# Altium PCB Control.PcbDoc (part 2 of 2)
Units mm, origin at the board's own origin, x right, y up, seen from the top; angles counter-clockwise.
Board outline 30.5 x 82 mm, 2 copper layers (Top Layer, Bottom Layer), stack 1.071 mm thick; 79 components, 65 nets, 365 pads, 467 vias.
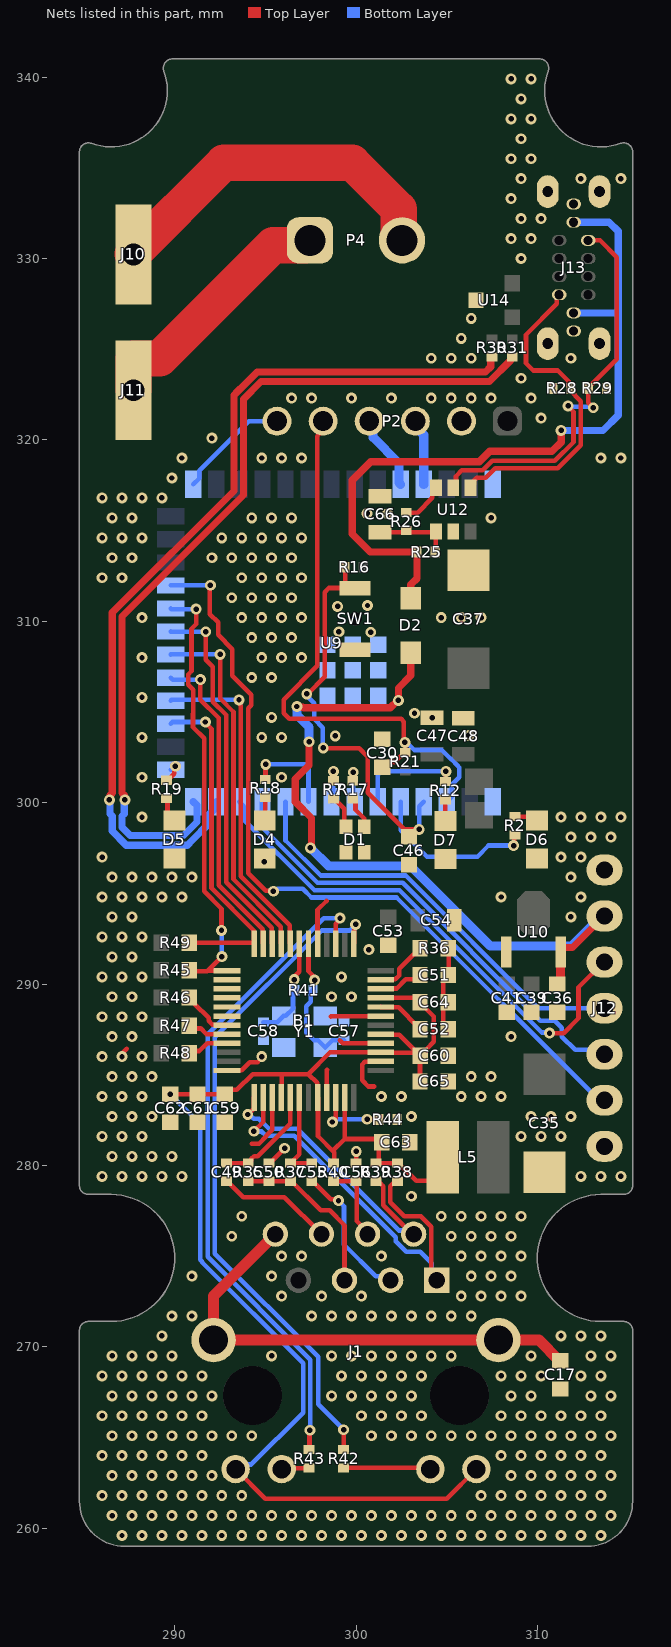
[diagram p2: the nets of this part, all layers, seen from the top]

## Via types
v1: diameter 0.6, hole 0.3, Top Layer to Bottom Layer, tented both sides, 467 vias

## Nets (pads, with @x,y where several pads share a name; then routed paths per layer and width w, separated by ;. In a path a pad name is that pad's centre, name@x,y a point inside that pad or via, vN(x,y) a via of type N, cw(c..) or ccw(c..) an arc to the next point about the centre after c; other vN are vias at no path point) (continued)
G: B1.3 B1.9 B1.14 B1.16 B1.19 B1.29 B1.38 B1.39 B1.40 B1.41 B1.42 B1.48 C17.1 C30.1 C35.2 C36.1 C37.2 C39.1 C41.1 C46.1 C47.1 C48.1 C50.1 C51.2 C52.2 C53.1 C54.1 C56.1 C57.1 C58.1 C59.1 C60.1 C61.1 C62.1 C63.1 C64.1 C65.1 C66.1 D1.3 D1.4 D4.2 D5.2 D6.2 D7.2 J12.1 J12.7 J13.A1/B12 J13.A12/B1 J13.MNT1 J13.MNT2 J13.MNT3 J13.MNT4 P2.2 R28.2 R29.2 R36.2 R44.1 SW1.2 U9.1 U9.40 U9.41 U9.42 U9.43 U9.44 U9.45 U9.46 U9.47 U9.48 U9.49 U10.1 U12.2 U14.3 Y1.2 Y1.4 | length 24.6
  Top Layer w0.254: v1@287.02,286.106 287.35,286.436 ; B1.48@292.738,285.235 292.761,285.258 293.693,285.258 294.134,285.699 294.589,285.699 ; 294.257,281.204 294.649,281.204 295.048,281.603 295.048,281.637 295.377,281.965 B1.3@295.377,283.745 ; C50.1@295.199,280.129 295.249,280.129 296.062,280.942 v1(296.062,280.949) ; B1.29@297.879,292.223 297.879,294.086 298.374,294.581 ; B1.9@298.379,283.747 298.379,285.247 298.399,285.267 ; 298.602,288.214 298.624,288.235 B1.19@301.367,288.235 ; 299.11,286.893 299.268,286.735 B1.16@301.367,286.735 ; C56.1@299.999,280.129 300.006,280.135 300.006,280.77 v1(300.012,280.776) ; 300.99,284.353 300.685,284.353 300.34,284.698 300.34,285.563 300.489,285.712 301.344,285.712 B1.14@301.367,285.735 ; C52.2@304.838,287.452 304.991,287.604 304.82,287.775 304.82,288.729 305.092,289.001 304.82,289.274 304.82,290.227 305.118,290.525 305.118,291.65 305.074,291.694 305.067,291.694 305.067,291.948 R36.2@305.092,291.973
  other v1: 287.1,259.6 288.2,259.6 289.3,259.6 290.4,259.6 291.5,259.6 292.6,259.6 293.7,259.6 294.8,259.6 295.9,259.6 297,259.6 298.1,259.6 299.2,259.6 300.3,259.6 301.4,259.6 302.5,259.6 303.6,259.6 304.7,259.6 305.8,259.6 306.9,259.6 308,259.6 309.1,259.6 310.2,259.6 311.3,259.6 312.4,259.6 313.5,259.6 286.55,260.7 287.65,260.7 288.75,260.7 289.85,260.7 290.95,260.7 292.05,260.7 293.15,260.7 294.25,260.7 295.35,260.7 296.45,260.7 297.55,260.7 298.65,260.7 299.75,260.7 300.85,260.7 301.95,260.7 303.05,260.7 304.15,260.7 305.25,260.7 306.35,260.7 307.45,260.7 308.55,260.7 309.65,260.7 310.75,260.7 311.85,260.7 312.95,260.7 314.05,260.7 286,261.8 287.1,261.8 288.2,261.8 289.3,261.8 290.4,261.8 291.5,261.8 292.6,261.8 293.7,261.8 306.9,261.8 308,261.8 309.1,261.8 310.2,261.8 311.3,261.8 312.4,261.8 313.5,261.8 286.55,262.9 287.65,262.9 288.75,262.9 289.85,262.9 290.95,262.9 292.05,262.9 308.55,262.9 309.65,262.9 310.75,262.9 311.85,262.9 312.95,262.9 314.05,262.9 286,264 287.1,264 288.2,264 289.3,264 290.4,264 291.5,264 308,264 309.1,264 310.2,264 311.3,264 312.4,264 313.5,264 286.55,265.1 287.65,265.1 288.75,265.1 289.85,265.1 290.95,265.1 292.05,265.1 293.15,265.1 294.25,265.1 300.85,265.1 301.95,265.1 303.05,265.1 304.15,265.1 305.25,265.1 306.35,265.1 307.45,265.1 308.55,265.1 309.65,265.1 310.75,265.1 311.85,265.1 312.95,265.1 314.05,265.1 286,266.2 287.1,266.2 288.2,266.2 289.3,266.2 290.4,266.2 291.5,266.2 300.3,266.2 301.4,266.2 302.5,266.2 303.6,266.2 308,266.2 309.1,266.2 310.2,266.2 311.3,266.2 312.4,266.2 313.5,266.2 286.55,267.3 287.65,267.3 288.75,267.3 289.85,267.3 290.95,267.3 292.05,267.3 298.65,267.3 299.75,267.3 300.85,267.3 301.95,267.3 303.05,267.3 308.55,267.3 309.65,267.3 312.95,267.3 314.05,267.3 286,268.4 287.1,268.4 288.2,268.4 289.3,268.4 290.4,268.4 291.5,268.4 299.2,268.4 300.3,268.4 301.4,268.4 302.5,268.4 303.6,268.4 308,268.4 309.1,268.4 310.2,268.4 312.4,268.4 313.5,268.4 286.55,269.5 287.65,269.5 288.75,269.5 289.85,269.5 295.35,269.5 298.65,269.5 299.75,269.5 300.85,269.5 301.95,269.5 303.05,269.5 304.15,269.5 305.25,269.5 309.65,269.5 312.95,269.5 314.05,269.5 289.3,270.6 311.3,270.6 312.4,270.6 313.5,270.6 289.85,271.7 290.95,271.7 297.55,271.7 298.65,271.7 299.75,271.7 300.85,271.7 301.95,271.7 303.05,271.7 304.15,271.7 305.25,271.7 306.35,271.7 295.9,272.8 298.1,272.8 300.3,272.8 305.8,272.8 306.9,272.8 308,272.8 309.1,272.8 290.95,273.9 295.35,273.9 306.35,273.9 307.45,273.9 308.55,273.9 295.9,275 297,275 301.4,275 305.8,275 306.9,275 308,275 309.1,275 293.15,276.1 305.25,276.1 306.35,276.1 307.45,276.1 308.55,276.1 293.7,277.2 304.7,277.2 305.8,277.2 306.9,277.2 308,277.2 309.1,277.2 303.05,278.3 286,279.4 287.1,279.4 288.2,279.4 289.3,279.4 290.4,279.4 312.4,279.4 313.5,279.4 314.6,279.4 286.55,280.5 287.65,280.5 288.75,280.5 289.85,280.5 286,281.6 287.1,281.6 288.2,281.6 309.1,281.6 310.2,281.6 311.3,281.6 286.55,282.7 287.65,282.7 288.75,282.7 303.05,282.7 309.65,282.7 310.75,282.7 311.85,282.7 286,283.8 287.1,283.8 288.2,283.8 301.4,283.8 302.5,283.8 305.8,283.8 306.9,283.8 308,283.8 286.55,284.9 287.65,284.9 288.75,284.9 306.35,284.9 307.45,284.9 286,286 287.1,286 288.2,286 294.8,286 286.55,287.1 287.65,287.1 308.55,287.1 286,288.2 287.1,288.2 288.2,288.2 286.55,289.3 287.65,289.3 298.65,289.3 299.75,289.3 286,290.4 287.1,290.4 288.2,290.4 299.2,290.4 286.55,291.5 287.65,291.5 300.711,291.897 286,292.6 287.1,292.6 288.2,292.6 286.55,293.7 287.65,293.7 311.85,293.7 286,294.8 287.1,294.8 288.2,294.8 289.3,294.8 290.4,294.8 308,294.8 312.4,294.8 286.55,295.9 287.65,295.9 288.75,295.9 289.85,295.9 290.95,295.9 311.85,295.9 294.945,296.748 286,297 311.3,297 312.4,297 311.85,298.1 312.95,298.1 314.05,298.1 288.2,299.2 311.3,299.2 312.4,299.2 313.5,299.2 314.6,299.2 288.2,301.4 295.9,301.4 288.2,303.6 294.8,303.6 295.9,303.6 298.856,303.682 306.222,303.708 304.191,304.682 295.35,304.7 303.225,304.927 288.2,305.8 294.25,306.9 295.35,306.9 288.2,308 294.8,308 295.9,308 297,308 294.25,309.1 295.35,309.1 296.45,309.1 300.812,309.397 299.06,309.423 288.2,310.2 293.7,310.2 294.8,310.2 295.9,310.2 297,310.2 304.7,310.2 305.8,310.2 306.9,310.2 298.983,310.82 300.634,310.871 293.15,311.3 294.25,311.3 295.35,311.3 296.45,311.3 286,312.4 287.1,312.4 293.7,312.4 294.8,312.4 295.9,312.4 297,312.4 286.55,313.5 287.65,313.5 292.05,313.5 293.15,313.5 294.25,313.5 295.35,313.5 296.45,313.5 286,314.6 287.1,314.6 288.2,314.6 292.6,314.6 293.7,314.6 294.8,314.6 295.9,314.6 297,314.6 286.55,315.7 287.65,315.7 294.25,315.7 295.35,315.7 296.45,315.7 307.45,315.7 301.727,315.925 300.609,315.951 286,316.8 287.1,316.8 288.2,316.8 289.3,316.8 289.85,317.9 290.4,319 294.8,319 295.9,319 297,319 313.5,319 314.6,319 292.05,320.1 310.2,321.2 296.45,322.3 297.55,322.3 299.75,322.3 301.95,322.3 304.15,322.3 305.25,322.3 306.35,322.3 307.45,322.3 309.65,322.3 309.1,323.4 304.15,324.5 305.25,324.5 306.35,324.5 311.85,324.5 305.8,325.6 306.35,326.7 309.1,330 308.55,331.1 309.65,331.1 309.1,332.2 310.2,332.2 308.55,333.3 309.1,334.4 312.4,334.4 314.6,334.4 308.55,335.5 309.65,335.5 309.1,336.6 308.55,337.7 309.65,337.7 309.1,338.8 308.55,339.9 309.65,339.9
GND_PE: C17.2 J1.8 J1.13 J1.14 | length 26.8
  Top Layer w0.6: J1.8@295.555,276.215 292.15,272.81 J1.14@292.15,270.375 J1.13@307.85,270.375 310.079,270.375 311.227,269.228 C17.2@311.252,269.228
NetB1_4: B1.4 B1.8 B1.11 B1.15 B1.17 B1.21 C59.2 C60.2 C61.2 C62.2 C63.2 C64.2 C65.2 J1.9 J1.12 L5.2 R38.2 R39.2 R40.1 | length 83
  Top Layer w0.254: v1(289.763,283.934) C61.2@291.262,283.934 C59.2@292.76,283.934 292.991,284.165 293.436,284.165 294.31,285.039 295.899,285.039 ; J1.12@293.36,263.265 295.006,261.619 304.994,261.619 J1.9@306.64,263.265 ; B1.4@295.879,283.747 295.902,283.77 295.902,284.478 295.904,284.48 295.904,285.033 295.899,285.039 ; 298.724,280.802 299.379,281.457 ; R40.1@298.755,280.129 298.811,280.184 298.811,280.716 297.902,281.624 297.902,283.724 297.856,283.77 297.856,284.549 297.367,285.039 ; B1.11@299.379,283.747 299.379,281.457 ; B1.17@301.367,287.235 301.39,287.212 302.385,287.212 303.219,286.378 303.244,286.378 303.307,286.315 303.307,286.29 C60.2@303.542,286.055 ; B1.21@301.367,289.235 301.387,289.255 303.274,289.255 C64.2@303.528,289.001 303.528,288.976 304.292,288.212 304.292,286.811 303.858,286.378 303.84,286.378 303.542,286.08 C60.2@303.542,286.062 ; C60.2@303.23,286.212 301.39,286.212 B1.15@301.367,286.235 298.563,286.235 297.367,285.039 ; C65.2@303.528,284.632 C60.2@303.528,286.04 ; L5.2@304.775,280.441 304.775,279.922 304.002,279.149 303.315,279.149 302.335,280.129 R38.2@302.285,280.129 R39.2@301.092,280.129 301.121,280.129 301.244,280.252 301.244,281.115 C63.2@301.409,281.28 301.231,281.457 299.379,281.457 ; 295.899,285.039 297.367,285.039
  Bottom Layer w0.254: v1(289.763,283.934) 291.412,282.286 291.412,274.792 291.516,274.688 291.516,274.65 297.081,269.085 297.081,266.372 294.225,263.517 293.612,263.517 J1.12@293.36,263.265
NetB1_10: B1.10 R44.2 | length 4.1
  Top Layer w0.254: v1(298.698,282.397) 298.755,282.454 298.755,282.473 298.879,282.598 B1.10@298.879,283.747 ; v1(300.609,282.55) 300.622,282.537 301.239,282.537 R44.2@301.252,282.524
  Bottom Layer w0.254: v1(298.698,282.397) 298.792,282.397 298.944,282.55 v1(300.609,282.55)
NetB1_20: B1.20 C52.1 | length 2.6
  Top Layer w0.254: B1.20@301.367,288.735 301.39,288.712 302.358,288.712 303.441,287.629 C52.1@303.441,287.604
NetB1_22: B1.22 C51.1 | length 2.5
  Top Layer w0.254: B1.22@301.367,289.735 301.39,289.758 302.241,289.758 302.747,290.264 303.307,290.264 C51.1@303.542,290.5
NetB1_23: B1.23 R36.1 | length 3.1
  Top Layer w0.254: B1.23@301.367,290.235 301.39,290.258 302.169,290.258 302.382,290.47 302.382,290.85 303.182,291.65 303.23,291.65 303.528,291.948 R36.1@303.528,291.971
NetB1_25: B1.25 R42.2 | length 37.1
  Top Layer w0.254: R42.2@299.314,264.33 v1(299.314,265.43) ; B1.25@299.879,292.223 299.902,292.246 299.902,293.117 299.978,293.192 v1(299.978,293.286)
  Bottom Layer w0.254: v1(299.314,265.43) 297.917,266.827 297.917,269.443 292.22,275.14 292.22,287.062 298.11,292.952 299.644,292.952 v1(299.978,293.286)
NetB1_27: B1.27 R43.2 | length 36.7
  Top Layer w0.254: R43.2@297.409,264.33 297.434,264.355 297.434,265.379 v1(297.459,265.405) ; B1.27@298.879,292.223 298.879,293.325 299.118,293.563 v1(299.118,293.633)
  Bottom Layer w0.254: v1(297.459,265.405) 297.485,265.43 297.485,269.291 291.816,274.96 291.816,287.229 298.22,293.633 v1(299.118,293.633)
NetB1_30: B1.30 C57.2 R41.2 Y1.1 | length 7.8
  Top Layer w0.254: B1.30@297.379,292.223 297.379,290.702 297.713,290.368 v1(297.713,290.22)
  Bottom Layer w0.254: v1(297.713,290.22) 297.671,290.178 297.671,289.704 297.506,289.539 297.506,289.019 297.256,288.769 297.256,287.325 297.682,286.899 297.907,286.899 Y1.1@298.305,286.501 298.703,286.899 299.337,286.899 C57.2@299.339,286.901
NetB1_31: B1.31 C58.2 R41.1 Y1.3 | length 7.1
  Top Layer w0.254: v1(296.596,290.246) 296.596,290.394 296.879,290.677 B1.31@296.879,292.223
  Bottom Layer w0.254: C58.2@294.894,287.901 295.656,287.901 295.664,287.893 296.021,288.251 Y1.3@296.13,288.251 ; R41.1@296.596,289.662 v1(296.596,290.246) ; R41.1@296.629,289.662 296.528,289.56 Y1.3@296.528,288.649 ; Y1.3@296.13,288.251 Y1.3@296.005,288.251 Y1.3@296.13,288.251 ; Y1.3@296.13,288.251 Y1.3@296.528,288.649 ; Y1.3@296.13,288.251 Y1.3@296.528,288.649 ; Y1.3@296.13,288.251 Y1.3@296.528,288.649
NetB1_32: B1.32 U9.18 | length 18.4
  Top Layer w0.254: v1(293.548,305.664) 293.614,305.597 293.614,305.38 293.652,305.342 293.652,295.944 296.356,293.239 296.356,292.246 B1.32@296.379,292.223
  Bottom Layer w0.254: U9.18@289.783,305.625 289.822,305.664 v1(293.548,305.664)
NetB1_33: B1.33 U9.20 | length 20.1
  Top Layer w0.254: v1(292.506,308.178) 292.506,305.742 293.248,305.001 293.248,295.777 295.856,293.168 295.856,292.246 B1.33@295.879,292.223
  Bottom Layer w0.254: U9.20@289.783,308.165 289.796,308.178 v1(292.506,308.178)
NetB1_34: B1.34 U9.21 | length 20.7
  Top Layer w0.254: v1(291.719,309.423) 291.719,307.873 292.102,307.49 292.102,305.575 292.844,304.833 292.844,295.609 295.356,293.097 295.356,292.246 B1.34@295.379,292.223
  Bottom Layer w0.254: U9.21@289.783,309.435 289.796,309.423 v1(291.719,309.423)
NetB1_35: B1.35 U9.19 | length 17.7
  Top Layer w0.254: v1(291.421,306.786) 291.421,305.684 292.44,304.666 292.44,295.442 294.856,293.025 294.856,292.246 B1.35@294.879,292.223
  Bottom Layer w0.254: U9.19@289.783,306.895 289.892,306.786 v1(291.421,306.786)
NetB1_36: B1.36 R49.2 U9.17 | length 18.8
  Top Layer w0.254: R49.2@290.818,292.278 B1.36@294.356,292.278 ; v1(291.695,304.448) 291.695,304.403 292.036,304.062 292.036,295.274 294.356,292.954 B1.36@294.356,292.278 ; B1.36@294.379,292.223 294.379,292.255 B1.36@294.356,292.278
  Bottom Layer w0.254: U9.17@289.783,304.355 289.876,304.448 v1(291.695,304.448)
NetB1_37: B1.37 R45.2 U9.22 | length 24.8
  Top Layer w0.254: R45.2@290.818,290.754 290.868,290.703 291.795,290.703 v1(292.608,291.516) ; v1(291.186,310.667) 291.186,309.852 290.932,309.598 290.932,307.259 290.74,307.068 290.74,306.504 291.017,306.227 291.017,304.9 291.014,304.896 291.014,304.166 291.632,303.548 291.632,295.107 292.583,294.156 v1(292.583,292.964) ; 291.795,290.735 B1.37@292.891,290.735
  Bottom Layer w0.254: U9.22@289.783,310.705 289.821,310.667 v1(291.186,310.667) ; v1(292.583,292.964) 292.595,292.951 292.595,291.529 v1(292.608,291.516)
NetB1_43: B1.43 R46.2 | length 2.8
  Top Layer w0.254: R46.2@290.818,289.255 291.116,288.957 291.116,288.893 291.877,288.132 291.877,287.97 292.089,287.758 292.868,287.758 B1.43@292.891,287.735
NetB1_44: B1.44 R47.2 | length 2.3
  Top Layer w0.254: R47.2@290.818,287.706 290.97,287.553 291.44,287.553 291.758,287.235 B1.44@292.891,287.235
NetB1_45: B1.45 R48.2 | length 2.4
  Top Layer w0.254: R48.2@290.818,286.182 290.881,286.118 291.072,286.309 291.363,286.309 291.79,286.735 B1.45@292.891,286.735
NetC30_2: C30.2 P2.5 R21.1 U9.3 | length 32.9
  Top Layer w0.254: P2.5@298.19,321.031 297.932,320.773 297.932,320.273 297.868,320.209 297.868,307.539 296.012,305.682 296.012,304.924 296.314,304.622 302.489,304.622 302.641,304.47 302.641,303.378 v1(302.692,303.327) 302.704,303.314 302.704,302.773 R21.1@302.717,302.76 302.667,302.76 302.147,302.24 301.745,302.24 C30.2@301.447,301.942
  Bottom Layer w0.254: v1(302.692,303.327) 302.785,303.327 303.211,302.901 304.729,302.901 305.222,302.408 305.234,302.408 305.633,302.009 305.633,301.997 305.689,301.941 305.689,301.396 305.288,300.996 305.288,300.335 U9.3@305.003,300.05
NetC46_2: C46.2 R16.1 SW1.1 U9.4 | length 22.3
  Top Layer w0.254: v1(297.286,305.994) 297.33,305.994 298.272,306.936 298.272,311.607 298.499,311.834 SW1.1@299.259,311.834 ; v1(298.196,303.022) 298.217,303.001 300.17,303.001 300.655,302.517 300.655,300.538 302.666,298.526 v1(303.479,298.526) ; R16.1@299.398,312.979 299.398,311.973 SW1.1@299.259,311.834 ; SW1.1@299.949,311.834 SW1.1@299.259,311.834
  Bottom Layer w0.254: v1(297.286,305.994) 297.286,305.9 297.696,305.49 297.696,304.619 298.175,304.14 298.175,303.043 v1(298.196,303.022) ; v1(303.479,298.526) 303.479,299.796 U9.4@303.733,300.05
NetC50_2: C50.2 J1.5 R35.2 R37.1 | length 9.3
  Top Layer w0.254: R35.2@294.056,279.129 C50.2@295.199,279.129 296.22,279.129 296.443,279.129 298.051,277.52 298.552,277.52 299.365,276.707 J1.5@299.365,273.675
NetC56_2: C56.2 J1.4 R40.2 | length 4.5
  Top Layer w0.254: R40.2@298.755,279.129 300.049,279.129 300.049,276.937 300.635,276.351 J1.4@300.635,276.215
NetC66_2: C66.2 R25.2 R26.1 U12.1 | length 4.3
  Top Layer w0.254: C66.2@301.32,314.9 304.355,314.9 U12.1@304.409,314.954 304.388,314.934 304.388,313.837 R25.2@304.368,313.817
NetD1_1: D1.1 R7.1 | length 1.9
  Top Layer w0.254: R7.1@298.755,300.211 298.805,300.211 299.353,299.662 299.353,298.763 D1.1@299.449,298.667
NetD1_2: D1.2 R17.1 | length 1.8
  Top Layer w0.254: R17.1@299.822,300.211 299.851,300.211 299.974,300.088 299.974,299.601 300.449,299.126 D1.2@300.449,298.667
NetD4_1: D4.1 R18.1 | length 1.3
  Top Layer w0.254: D4.1@294.97,299.017 294.996,299.043 R18.1@294.996,300.287
NetD5_1: D5.1 R19.1 | length 1.4
  Top Layer w0.254: R19.1@289.56,300.236 289.607,300.189 289.607,299.402 D5.1@289.992,299.017
NetD6_1: D6.1 R2.1 | length 1.4
  Top Layer w0.254: R2.1@308.762,299.229 309.516,299.229 309.643,299.356 D6.1@309.982,299.017
NetD7_1: D7.1 R12.1 | length 1.2
  Top Layer w0.254: D7.1@304.927,298.992 R12.1@304.927,300.16
NetJ1_10: J1.10 R42.1 | length 4.8
  Top Layer w0.254: R42.1@299.314,263.33 304.035,263.33 J1.10@304.1,263.265
NetJ1_11: J1.11 R43.1 | length 1.5
  Top Layer w0.254: J1.11@295.9,263.265 295.932,263.297 297.376,263.297 R43.1@297.409,263.33
NetJ10_1: J10.1 P4.2 | length 19.6
  Top Layer w2: J10.1@287.68,330.251 292.71,335.28 299.796,335.28 302.358,332.718 302.358,331.182 P4.2@302.54,331
NetJ11_1: J11.1 P4.1 | length 14.2
  Top Layer w2: J11.1@287.731,322.733 287.731,324.483 289.177,324.483 295.419,330.725 297.185,330.725 P4.1@297.46,331
NetJ12_3: J12.3 U9.12 | length 28.4
  Top Layer w0.254: v1(310.667,287.299) 311.455,287.299 312.268,288.112 312.268,289.814 J12.3@313.665,291.211
  Bottom Layer w0.254: U9.12@293.573,300.05 293.819,299.804 293.819,299.068 297.711,295.176 302.399,295.176 310.244,287.331 310.636,287.331 v1(310.667,287.299)
NetJ12_4: J12.4 U9.10 | length 23.5
  Bottom Layer w0.254: U9.10@296.113,300.05 296.113,297.917 298.046,295.984 302.734,295.984 310.047,288.671 J12.4@313.665,288.671
NetJ12_5: J12.5 U9.11 | length 25.7
  Bottom Layer w0.254: U9.11@294.843,300.05 294.818,300.025 294.818,298.641 297.879,295.58 302.567,295.58 310.166,287.98 310.949,287.98 311.348,287.581 311.348,287.101 312.076,286.373 313.423,286.373 J12.5@313.665,286.131
NetJ12_6: J12.6 U9.23 | length 44
  Top Layer w0.254: v1(291.973,311.988) 291.946,311.961 291.946,310.397 292.4,309.943 292.4,309.248 293.187,308.46 293.187,307.724 293.187,306.987 293.83,306.345 294.229,305.946 294.229,305.382 294.056,305.209 294.056,296.111 295.021,295.146 295.413,295.146 v1(295.444,295.114)
  Bottom Layer w0.254: U9.23@289.796,311.988 v1(291.973,311.988) ; v1(295.444,295.114) 295.538,295.114 295.684,295.261 297.055,295.261 297.544,294.772 302.232,294.772 313.413,283.591 J12.6@313.665,283.591
NetJ13_A5: J13.A5 R28.1 U12.4 | length 18.3
  Top Layer w0.254: U12.4@306.309,317.354 306.507,317.552 306.507,317.771 306.656,317.92 307.16,317.92 307.68,318.44 311.125,318.44 312.395,319.71 312.395,322.14 311.777,322.758 R28.1@311.853,322.834 311.73,322.957 311.73,323.219 311.125,323.825 309.781,323.825 309.372,324.233 309.372,325.806 311.07,327.504 311.07,327.87 J13.A5@311.2,328
NetJ13_B5: J13.B5 R29.1 U12.5 | length 22.5
  Top Layer w0.254: U12.5@305.359,317.354 305.513,317.508 305.513,318.005 305.833,318.324 306.993,318.324 307.512,318.844 310.957,318.844 311.991,319.877 311.991,321.557 311.693,321.854 v1(311.693,321.879) ; J13.B5@312.8,331 313.449,331 314.376,330.073 314.376,324.451 312.809,322.884 312.809,322.038 v1(313.076,321.772)
  Bottom Layer w0.254: v1(311.693,321.879) 311.747,321.825 313.022,321.825 v1(313.076,321.772)
NetP2_3: P2.3 U9.37 | length 3.7
  Bottom Layer w0.5: P2.3@303.27,321.031 303.27,320.733 303.733,320.27 U9.37@303.733,317.55
NetP2_4: P2.4 U9.36 | length 4.2
  Bottom Layer w0.5: P2.4@300.73,321.031 300.94,320.82 300.94,320.138 302.365,318.713 302.365,317.648 U9.36@302.463,317.55
NetP2_6: P2.6 U9.27 | length 6.3
  Bottom Layer w0.254: U9.27@291.033,317.55 291.356,317.873 291.356,318.291 294.096,321.031 P2.6@295.65,321.031
NetR2_2: R2.2 U9.5 | length 9.3
  Top Layer w0.254: v1(308.686,297.637) 308.724,297.675 308.724,298.191 R2.2@308.762,298.229
  Bottom Layer w0.254: U9.5@302.463,300.05 302.463,298.475 303.911,297.028 306.695,297.028 307.305,297.637 v1(308.686,297.637)
NetR7_2: R7.2 U9.8 | length 2.2
  Top Layer w0.254: R7.2@298.755,301.211 v1(298.755,301.727)
  Bottom Layer w0.254: U9.8@298.653,300.05 298.755,300.152 v1(298.755,301.727)
NetR12_2: R12.2 U9.6 | length 5.9
  Top Layer w0.254: R12.2@304.927,301.16 304.94,301.172 304.94,301.714 v1(304.952,301.727)
  Bottom Layer w0.254: U9.6@301.193,300.05 301.193,301.523 301.396,301.727 v1(304.952,301.727)
NetR17_2: R17.2 U9.7 | length 2.1
  Top Layer w0.254: R17.2@299.822,301.211 299.834,301.223 299.834,301.663 v1(299.847,301.676)
  Bottom Layer w0.254: v1(299.847,301.676) 299.847,300.126 U9.7@299.923,300.05
NetR18_2: R18.2 U9.9 | length 5.3
  Top Layer w0.254: R18.2@294.996,301.287 295.008,301.299 295.008,302.095 v1(295.021,302.108)
  Bottom Layer w0.254: v1(295.021,302.108) 297.383,302.108 U9.9@297.383,300.05
NetR19_2: R19.2 U9.15 | length 1.3
  Top Layer w0.254: R19.2@289.56,301.236 289.61,301.236 289.976,301.602 289.976,301.94 v1(290.043,302.006)
  Bottom Layer w0.254: U9.15@289.783,301.815 289.852,301.815 v1(290.043,302.006)
NetR26_2: R26.2 U12.6 | length 2.4
  Top Layer w0.254: R26.2@302.768,315.993 303.395,315.993 304.211,316.809 304.211,317.156 U12.6@304.409,317.354
RX_N: B1.5 C49.2 R35.1 | length 6
  Top Layer w0.25: C49.2@292.862,280.129 R35.1@294.106,280.129 ; R35.1@294.056,280.129 R35.1@294.106,280.129 ; B1.5@296.379,283.747 296.379,282.308 294.586,280.515 294.377,280.515 294.231,280.368 294.231,280.254 R35.1@294.106,280.129
RX_P: B1.6 C55.2 R37.2 | length 5
  Top Layer w0.25: B1.6@296.883,283.747 296.883,280.619 296.568,280.304 296.568,280.254 296.443,280.129 R37.2@296.393,280.129 296.568,280.129 C55.2@297.561,280.129
RXN_N: C49.1 J1.6 | length 6.4
  Top Layer w0.254: C49.1@292.862,279.129 292.912,279.129 293.784,278.257 296.053,278.257 298.086,276.224 J1.6@298.095,276.224
RXN_P: C55.1 J1.3 | length 7.8
  Top Layer w0.254: C55.1@297.561,279.129 297.611,279.129 298.611,278.129 298.968,278.129 v1(299.034,278.063)
  Bottom Layer w0.254: v1(299.034,278.063) 299.034,278.046 299.339,277.741 299.339,275.641 301.086,273.894 301.686,273.894 J1.3@301.905,273.675
TX_N: B1.1 J1.2 R39.1 | length 16.9
  Top Layer w0.257: v1(294.029,282.81) 294.379,283.16 B1.1@294.379,283.747 ; R39.1@301.092,279.129 301.213,279.007 301.346,279.007 301.497,278.857 301.497,277.804 J1.2@303.175,276.126
  Bottom Layer w0.257: v1(294.029,282.81) 294.122,282.81 294.364,282.568 294.65,282.568 295.202,282.015 296.761,282.015 302.357,276.418 302.972,276.418 J1.2@303.175,276.215
TX_P: B1.2 J1.1 R38.1 | length 23.4
  Top Layer w0.257: v1(294.367,281.885) 294.879,282.397 B1.2@294.879,283.747 ; R38.1@302.285,279.129 302.164,279.007 302.031,279.007 301.88,278.857 301.88,277.963 302.65,277.193 303.58,277.193 304.153,276.62 304.153,273.967 J1.1@304.445,273.675
  Bottom Layer w0.257: v1(294.367,281.885) 294.383,281.869 294.806,281.869 295.043,281.632 296.602,281.632 302.197,276.037 302.197,275.81 302.77,275.237 303.539,275.237 304.166,274.61 304.166,273.954 J1.1@304.445,273.675
USB_D_N: R30.1 U9.13 | length 49.8
  Top Layer w0.403: v1(286.404,300.152) 286.442,300.19 286.442,300.404 286.567,300.528 286.567,310.48 293.268,317.182 293.268,322.465 293.423,322.62 293.858,323.055 294.237,323.434 294.548,323.745 307.137,323.745 307.428,324.035 307.428,324.52 307.476,324.569 R30.1@307.492,324.569
  Bottom Layer w0.403: v1(286.404,300.152) 286.442,300.114 286.442,299.387 286.567,299.263 286.567,298.434 287.341,297.66 290.706,297.66 291.016,297.97 291.834,298.788 291.834,299.281 292.303,299.75 U9.13@292.303,300.05
USB_D_P: R31.1 U9.14 | length 48.2
  Top Layer w0.403: v1(287.258,300.152) 287.221,300.19 287.221,300.404 287.096,300.528 287.096,310.261 293.798,316.963 293.798,322.246 294.767,323.215 307.356,323.215 308.511,324.37 308.511,324.52 308.56,324.569 R31.1@308.61,324.569
  Bottom Layer w0.403: v1(287.258,300.152) 287.221,300.114 287.221,299.387 287.096,299.263 287.096,298.653 287.56,298.189 290.487,298.189 291.23,298.932 291.23,299.854 U9.14@291.033,300.05
V_BUS: D2.2 J13.A4/B9 J13.B4/A9 R25.1 | length 41.4
  Top Layer w0.4: D2.2@303.022,311.278 303.022,312.03 303.368,312.376 R25.1@303.368,313.817 300.787,313.817 299.796,314.808 299.796,317.781 300.816,318.801 306.795,318.801 307.366,319.372 310.81,319.372 311.31,319.871 v1(311.31,320.523)
  Bottom Layer w0.4: v1(311.31,320.523) 313.614,320.523 314.452,321.36 314.452,331.496 313.947,332 J13.B4/A9@312,332 ; J13.A4/B9@312,327 314.452,327
VCC_2: C36.2 D2.1 J12.2 U10.3 | length 41.5
  Top Layer w0.4: v1(296.738,305.303) 296.776,305.265 297.082,305.265 297.107,305.24 301.884,305.24 302.282,305.638 v1(302.336,305.638) 302.336,306.324 303.022,307.01 D2.1@303.022,308.278 ; v1(297.412,303.362) 297.412,302.057 296.655,301.299 296.655,300.049 297.548,299.156 297.548,297.744 297.522,297.718 297.522,297.547 v1(297.484,297.509) ; U10.3@311.341,292.015 311.929,292.015 J12.2@313.665,293.751
  Top Layer w0.5: C36.2@311.099,290.005 311.103,290.005 311.278,290.18 U10.3@311.278,291.767
  Bottom Layer w0.5: v1(296.738,305.303) 296.757,305.284 296.757,304.813 297.412,304.158 v1(297.412,303.362) ; v1(297.484,297.509) 298.482,296.511 302.999,296.511 307.409,292.1 311.899,292.1 313.55,293.751 J12.2@313.7,293.751
pads on no net: B1.7 B1.12 B1.13 B1.18 B1.24 B1.26 B1.46 B1.47 J1. J1.7 J13.A8 J13.B8 SW1. U9.16 U9.24 U9.25 U9.26 U9.28 U9.29 U9.30 U9.31 U9.32 U9.33 U9.34 U9.35 U9.38 U9.39 U12.3

## Polygon pours and split planes (outlines as drawn)
G on Bottom Layer "G_L02_P002" (solid, pour order 2): 284.707,261.452 284.707,270.852 cw(c285.206,270.852) 285.207,271.352 286.457,271.352 ccw(c286.457,274.852) 286.457,278.352 285.207,278.352 cw(c285.206,278.852) 284.707,278.852 284.707,318.189 288.93,318.189 293.014,324.739 303.632,324.739 308.012,329.12 308.012,340.952 310.081,340.952 cw(c310.081,340.452) 310.549,340.278 ccw(c313.456,339.202) 314.533,336.295 cw(c314.707,335.826) 315.207,335.826 315.207,278.852 cw(c314.707,278.852) 314.707,278.352 313.457,278.352 ccw(c313.457,274.852) 313.457,271.352 314.707,271.352 cw(c314.707,270.852) 315.207,270.852 315.207,261.452 cw(c312.707,261.452) 312.707,258.952 287.207,258.952 cw(c287.207,261.452)
G on Top Layer "G_L01_P003" (solid, pour order 3): 284.687,261.514 284.687,270.914 cw(c285.187,270.914) 285.187,271.414 286.437,271.414 ccw(c286.437,274.914) 286.437,278.414 285.187,278.414 cw(c285.187,278.914) 284.687,278.914 284.687,318.252 289.022,318.252 293.027,324.764 302.362,324.764 307.899,330.302 307.899,341.014 310.061,341.014 cw(c310.061,340.515) 310.53,340.341 ccw(c313.437,339.264) 314.513,336.357 cw(c314.687,335.889) 315.187,335.888 315.187,278.914 cw(c314.687,278.914) 314.687,278.414 313.437,278.414 ccw(c313.437,274.914) 313.437,271.414 314.687,271.414 cw(c314.687,270.915) 315.187,270.914 315.187,261.514 cw(c312.687,261.514) 312.687,259.014 287.187,259.014 cw(c287.187,261.514)

## Other copper
Top Layer:
  pour cut-out: 308.254,299.949 308.254,317.83 315.239,317.83 315.239,299.949
Bottom Layer:
  pour cut-out: 308.254,317.83 315.218,317.83 315.218,299.822 308.254,299.822

## Silkscreen, mask and mechanical layers (free items; w line width, h text height)
Top Overlay:
  drawing of 256 lines, arcs and shapes, not listed
  text "RX" at 299.491,322.885 h1.1 r90
  text "EN" at 297.764,322.859 h1.1 r90
  text "TX" at 301.32,322.859 h1.1 r90
  text "BOOT" at 296.088,322.809 h1.1 r90
  text "GND" at 302.971,322.809 h1.1 r90
  text "+3.3V" at 305.232,322.758 h1.1 r90
  text "1" at 314.541,298.336 h1.02
  text "7" at 310.717,281.126 h1.02 r270
Bottom Overlay:
  lines w0.013: 285.25,271.4 ccw(c285.25,270.9) 284.75,270.9 284.75,261.5 ccw(c287.25,261.5) 287.25,259 292,259 ; 285.25,278.4 cw(c285.25,278.9) 284.75,278.9 284.75,335.874 cw(c285.25,335.874) 285.424,336.343 ccw(c286.5,339.25) 289.407,340.326 cw(c289.876,340.5) 289.876,341 310.124,341 cw(c310.124,340.5) 310.593,340.326 ccw(c313.5,339.25) 314.576,336.343 cw(c314.75,335.874) 315.25,335.874 315.25,278.9 cw(c314.75,278.9) 314.75,278.4 313.5,278.4 ccw(c313.5,274.9) 313.5,271.4 314.75,271.4 cw(c314.75,270.9) 315.25,270.9 315.25,261.5 cw(c312.75,261.5) 312.75,259 308,259 ; 292,277.8 292,256.5 308,256.5 308,277.8 ; 293.92,338.54 306.08,338.54 ; 293.92,339.827 306.08,339.827 ; 293.92,341 293.92,329 306.08,329 306.08,341 ; 296.413,341 296.96,339.827 ; 297.96,339.827 298.507,341 ; 301.493,341 302.04,339.827 ; 303.04,339.827 303.587,341
  lines w0.1: 298.069,305.511 301.623,305.511 301.623,309.04 298.069,309.04 298.069,305.511
Mechanical 1:
  lines w0.013: 285.25,271.4 ccw(c285.25,270.9) 284.75,270.9 284.75,261.5 ccw(c287.25,261.5) 287.25,259 312.75,259 ccw(c312.75,261.5) 315.25,261.5 315.25,270.9 ccw(c314.75,270.9) 314.75,271.4 313.5,271.4 cw(c313.5,274.9) 313.5,278.4 314.75,278.4 ccw(c314.75,278.9) 315.25,278.9 315.25,335.874 ccw(c314.75,335.874) 314.576,336.343 cw(c313.5,339.25) 310.593,340.326 ccw(c310.124,340.5) 310.124,341 289.876,341 ccw(c289.876,340.5) 289.407,340.326 cw(c286.5,339.25) 285.424,336.343 ccw(c285.25,335.874) 284.75,335.874 284.75,278.9 ccw(c285.25,278.9) 285.25,278.4
  lines w0.1: 285.717,319.28 285.717,319.303 288.73,319.303 288.73,319.28 285.717,319.28 ; 289.129,319.203 289.306,319.203 289.306,322.986 289.129,322.986 289.129,319.203

## Text inside footprints (layer, text, board x,y; h text height)
P2: Top Overlay "1" at 308.47,319.331 h1.02 r180; Top Overlay "6" at 296.03,319.331 h1.02 r180
U9: Bottom Overlay "GND" at 307.336,297.216 h0.5 r270; Bottom Overlay "EN" at 304.796,297.978 h0.5 r270; Bottom Overlay "+3V3" at 306.066,296.962 h0.5 r270; Bottom Overlay "RX0" at 302.256,318.933 h0.5 r270; Bottom Overlay "TX0" at 303.399,318.933 h0.5 r270; Bottom Overlay "IO0_BOOT" at 290.785,318.768 h0.5 r270; Bottom Overlay "GND" at 307.336,318.806 h0.5 r270